# Altium PCB Transmitter_PCB_V4.0.PcbDoc (part 1 of 3)
Units mm, origin at the board's own origin, x right, y up, seen from the top; angles counter-clockwise.
Board outline 50 x 50 mm, 2 copper layers (Top Layer, Bottom Layer), stack 1.448 mm thick; 146 components, 102 nets, 432 pads, 97 vias.
Unrouted connection lines stored in the file: 102.
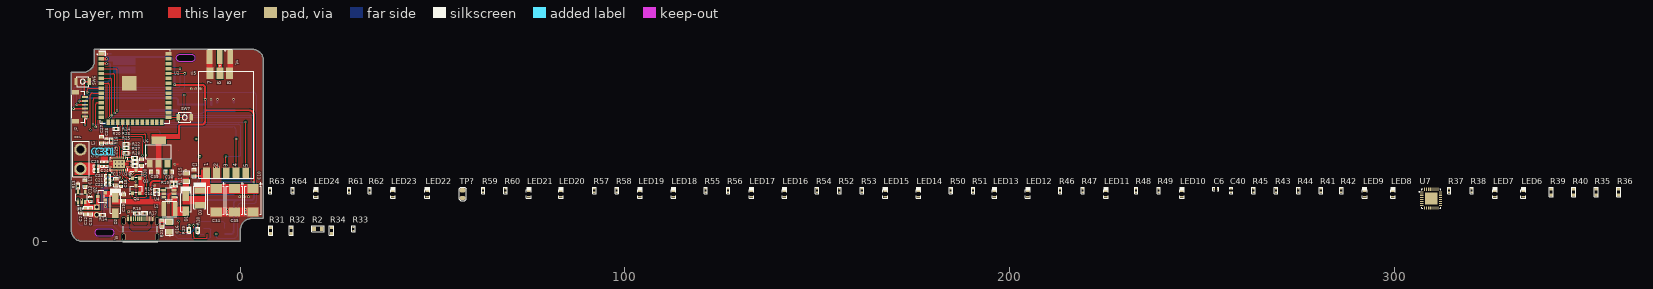
[diagram p0: Top Layer view]
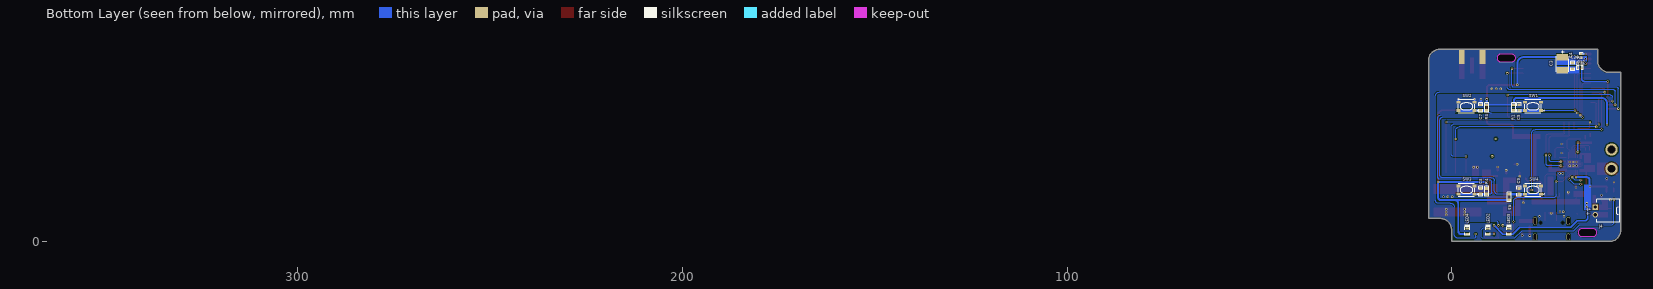
[diagram p1: Bottom Layer view, seen from below]

## Layer stack, top to bottom
Top Solder: solder mask 0.0762, Solder Resist, Dk 3.5
Top Layer: signal copper 0.254
Dielectric 1: dielectric 0.9398, FR-4, Dk 4.8
Bottom Layer: signal copper 0.254
Bottom Solder: solder mask 0.0762, Solder Resist, Dk 3.5

## Board outline
-44,3 -44,43.975 -41.008,43.975 -40.962,43.975 ccw(c-40.962,46.975) -37.962,46.975 -37.962,50 3,50 cw(c3,47) 6,47 6,6 3.046,6 3,6 ccw(c3,3) 0,3 0,0 -41,0 cw(c-41,3)
cut-out: -15.636,46.73 cw(c-15.636,47.73) -16.636,47.73 cw(c-15.636,47.73) -15.636,48.73 -12.81,48.73 cw(c-12.81,47.73) -11.81,47.73 cw(c-12.81,47.73) -12.81,46.73
cut-out: -36.746,1.308 cw(c-36.746,2.308) -37.746,2.308 cw(c-36.746,2.308) -36.746,3.308 -33.92,3.308 cw(c-33.92,2.308) -32.92,2.308 cw(c-33.92,2.308) -33.92,1.308

## Design rules (kind name [scope] priority, off if disabled: settings)
BoardOutlineClearance [All] p1: gap=0 ignorepadtopadclearanceinfootprint=FALSE except(0.254: Poly-OutlineEdge)
Clearance [All] p1: gap=0.178 ignorepadtopadclearanceinfootprint=FALSE except(0.127: SMDPad-Hole; 0.305: Arc-Poly Track-Poly SMDPad-Poly THPad-Poly Via-Poly Fill-Poly Poly-Poly)
ComponentClearance [All] p1: gap=0 collisioncheckmode=3 verticalgap=0 showdistances=FALSE
HoleSize [All] p1: absolutevalues=TRUE maxlimit=25.4 minlimit=0.025 maxpercent=80.000 minpercent=20.000
HoleToHoleClearance [All] p1: gap=0 allowstackedmicrovias=TRUE
MinimumSolderMaskSliver [All] p1: minsoldermaskwidth=0
PolygonConnect [All] p1: connectstyle=Direct reliefconductorwidth=0.254 reliefentries=4 polygonreliefangle="90 Angle" airgapwidth=0.254
RoutingVias [All] p1: holewidth=0.3 width=0.6 viastyle="Through Hole" minholewidth=0.3 minwidth=0.5 maxholewidth=0.3 maxwidth=0.6
SilkToSilkClearance [All] p1: silktosilkclearance=0
SilkToSolderMaskClearance [IsPad] p1: minsilkscreentomaskgap=0 clearancetoexposedcopper=TRUE
SolderMaskExpansion [All] p1: expansion=0.102 istentingtop=FALSE
SupplyNets "Schematic Supply Nets_12" [InNet('VCCP')] p1: voltage=0.000
SupplyNets "Schematic Supply Nets_11" [InNet('VLED')] p2: voltage=0.000
SupplyNets "Schematic Supply Nets_10" [InNet('3V3_WIFI')] p3: voltage=0.000
SupplyNets "Schematic Supply Nets_9" [InNet('EN1')] p4: voltage=0.000
SupplyNets "Schematic Supply Nets_8" [InNet('EN2')] p5: voltage=0.000
SupplyNets "Schematic Supply Nets_7" [InNet('GND')] p6: voltage=0.000
SupplyNets "Schematic Supply Nets_6" [InNet('VUSB')] p7: voltage=0.000
SupplyNets "Schematic Supply Nets_5" [InNet('VCC')] p8: voltage=0.000
SupplyNets "Schematic Supply Nets_4" [InNet('EN')] p9: voltage=0.000
SupplyNets "Schematic Supply Nets_3" [InNet('+5V')] p10: voltage=0.000
SupplyNets "Schematic Supply Nets_2" [InNet('VBAT')] p11: voltage=0.000
SupplyNets "Schematic Supply Nets_1" [InNet('POWER')] p12: voltage=0.000
SupplyNets "Schematic Supply Nets" [InNet('VCC#')] p13: voltage=0.000
Width [All] p1: maxlimit=1.27 minlimit=0.152 preferedwidth=0.254 minimp=50.000000 maximp=50.000000 favimp=50.000000
24 further rules are at their usual default settings.

## Classes and differential pairs
component class U_Power_Sheet: C11 C12 C13 C14 C15 C16 C17 C18 C19 C20 C21 C22 C23 C24 C25 C26 C27 C28 C29 C30 C31 C32 C38 C39 D1 D2 J3 L2 L3 LED2 LED5 Q2 Q3 Q4 R2 R10 R11 R13 R14 R15 R16 R17 R18 R19 R21 R22 R23 R24 R25 R27 R28 R29 R31 R32 R33 R34 U1 U3 U4 U6
component class U_Transmitter_Section: C1 C2 C3 C4 C5 C6 C7 C8 C9 C10 C33 C34 C35 C36 C37 C40 D3 J1 J2 J4 LED4 LED6 LED7 LED8 LED9 LED10 LED11 LED12 LED13 LED14 LED15 LED16 LED17 LED18 LED19 LED20 LED21 LED22 LED23 LED24 R1 R3 R4 R5 R8 R20 R35 R36 R37 R38 R39 R40 R41 R42 R43 R44 R45 R46 R47 R48 R49 R50 R51 R52 R53 R54 R55 R56 R57 R58 R59 R60 R61 R62 R63 R64 SW1 SW2 SW3 SW4 SW6 SW7 TP? U2 U5 U7

## Components (designator, comment, footprint, x,y, rotation, side; value= is the part's Value field where it differs from the comment)
C1 "0.1uF" Cap0603 -11.989,17.805 r90 top
C2 "0.47uF" Cap-0402 -41.575,7.976 r270 top
C3 "47uF" Case-B -28.829,46.228 r270 bottom
C4 "100nF" Cap-0402 -33.634,48.298 r270 bottom
C5 "0.1uF" Cap0603 -17.526,34.8 r90 bottom
C6 "100nF" Cap-0402 253.688,13.64 r0 top
C7 "0.1uF" Cap0603 -7.62,34.8 r90 bottom
C8 "0.1uF" Cap0603 -7.62,13.058 r90 bottom
C9 "0.1uF" Cap0603 -17.526,13.058 r90 bottom
C10 "330uF" CASE-D 3.293,10.705 r270 top
C11 "10uF" Cap-0603 -40.325,15.05 r270 top
C12 "10uF" Cap-0603 -40.177,7.874 r90 top
C13 "1nF" Cap-0402 -38.978,11.032 r270 top
C14 "1nF" Cap-0402 -21.797,12.381 r0 top
C15 "22uF" Cap-0805 -14.023,16.711 r270 top
C16 "4.7nF" Cap-1206 -18.415,3.81 r90 top
C17 "10uF" Cap-0603 -32.345,15.478 r90 top
C18 "100nF" Cap-0402 -31,14.912 r90 top
C19 "10uF" Cap-0603 -30.36,11.373 r270 top
C20 "10uF" Cap-0603 -25.704,20.491 r90 top
C21 "0.47uF" Cap-0402 -34.521,15.946 r0 top value=470nF
C22 "22nF" Cap-0402 -34.528,14.874 r0 top
C23 "10nF" Cap-0402 -34.521,17.014 r0 top
C24 "68nF" Cap-0402 -37.505,18.37 r0 top
C25 "68nF" Cap-0402 -37.505,19.496 r0 top
C26 "1nF" Cap-0402 -34.805,20.151 r270 top
C27 "10uF" Cap-0603 -36.042,26.44 r270 top
C28 "100nF" Cap-0402 -34.747,26.149 r270 top
C29 "10nF" Cap-0402 -33.774,23.293 r90 top
C30 "22nF" Cap-0402 -35.922,23.293 r90 top
C31 "0.47uF" Cap-0402 -34.834,23.293 r90 top value=470nF
C32 "1nF" Cap-0402 -35.922,20.151 r270 top
C33 "0.47uF" Cap-0603 -38.887,7.874 r90 top
C34 "330uF" CASE-D -6.292,10.702 r270 top
C35 "330uF" CASE-D -1.493,10.705 r270 top
C36 "22uF" Cap-0603 -31.496,45.593 r90 bottom
C37 "1uF" Cap-0402 -33.393,45.124 r180 bottom
C38 "22uF" Cap-0603 -18.521,18.109 r180 top
C39 "22uF" Cap-0603 -22.368,18.109 r0 top
C40 "100nF" Cap-0402 257.625,13.259 r90 top
D1 "SS32 /SMA(DO-214AC)" SMA -14.158,9.815 r270 top
D2 "SS16" SMA -32.487,9.373 r270 top
D3 "1N4007- SMD" SMA(DO-214AC) -10.541,11.328 r270 top
J1 "DNP" CON-SMA-EDGE_S -8.048,47.981 r270 top
J2 "Voltlink Target" "Voltlink Target" -41.656,35.052 r90 top
J3 "TYPE-C-31-M-12" TYPE-C-31-M-12_ -26.035,3.556 r0 top
J4 "PH-2AW" PH-2AW -37.383,7.947 r270 bottom
L2 "4.7uH" SPH4012H4R7MT -18.451,8.418 r0 top
L3 "13.3uH" "Th Hole Test Point (3.7mm Drill 6mm pad)" -41.6,23.907 r270 top
LED2 "RED" LED-0603 -9.5,2.675 r90 bottom
LED4 "Emerald" LED-0603 -4.064,2.675 r90 bottom
LED5 "RED" LED-0603 -14.935,2.675 r90 bottom
LED6 "Emerald" LED-0603 333.622,12.37 r90 top
LED7 "Emerald" LED-0603 326.256,12.37 r90 top
LED8 "Emerald" LED-0603 299.738,12.37 r90 top
LED9 "Emerald" LED-0603 292.372,12.37 r90 top
LED10 "Emerald" LED-0603 244.874,12.37 r90 top
LED11 "Emerald" LED-0603 225.062,12.37 r90 top
LED12 "Emerald" LED-0603 204.768,12.37 r90 top
LED13 "Emerald" LED-0603 196.132,12.37 r90 top
LED14 "Emerald" LED-0603 176.32,12.37 r90 top
LED15 "Emerald" LED-0603 167.684,12.37 r90 top
LED16 "Emerald" LED-0603 141.522,12.37 r90 top
LED17 "Emerald" LED-0603 132.886,12.37 r90 top
LED18 "Emerald" LED-0603 112.591,12.37 r90 top
LED19 "Emerald" LED-0603 103.955,12.37 r90 top
LED20 "Emerald" LED-0603 83.381,12.37 r90 top
LED21 "Emerald" LED-0603 74.999,12.37 r90 top
LED22 "Emerald" LED-0603 48.583,12.37 r90 top
LED23 "Emerald" LED-0603 39.693,12.37 r90 top
LED24 "Emerald" LED-0603 19.627,12.37 r90 top
Q2 "WPM2015-3/TR" Sot-23 -36.155,11.73 r90 top
Q3 "WPM2015-3/TR" Sot-23 -27.137,17.493 r0 top
Q4 "WPM2015-3/TR" Sot-23 -27.137,13.538 r0 top
R1 "4.7K" RES-0603 -16.171,34.8 r270 bottom
R2 "DNP" Res-0805 20.135,3.302 r0 top
R3 "4.7K" RES-0603 -9.144,34.8 r270 bottom
R4 "4.7K" RES-0603 -9.144,13.058 r270 bottom
R5 "4.7K" RES-0603 -15.008,11.521 r90 bottom
R8 "10K" Res-0402 -33.393,46.228 r0 bottom
R10 "680R" Res-0402 -11.049,2.921 r90 top
R11 "11K" Res-0402 -16.773,14.971 r90 top value=11kR
R13 "2.7K" Res-0402 -42.225,14.453 r270 top value=2.7kR
R14 "100K" Res-0402 -35.839,6.947 r0 top
R15 "5.1K" Res-0402 -26.912,7.366 r0 top
R16 "47K" Res-0402 -21.797,13.381 r0 top
R17 "5.1K" Res-0402 -24.935,7.366 r180 top
R18 "20K" Res-0402 -33.52,26.149 r90 top
R19 "1.5K" Res-0402 -17.783,14.971 r270 top
R20 "0R" Res-0402 -32.322,29.337 r0 top
R21 "1M" Res-0603 -20.32,4.699 r90 top
R22 "470R" Res-0402 -27.427,21.801 r0 top
R23 "80.6R" Res-0402 -29.662,24.325 r180 top
R24 "200R" Res-0402 -29.662,25.359 r180 top
R25 "10K" Res-0402 -29.662,23.006 r0 top
R27 "100K" Res-0402 -27.376,20.717 r0 top
R28 "100K" Res-0402 -27.376,19.644 r180 top
R29 "120R" Res-0402 -13.335,2.921 r270 top
R31 "0R" Res-0603 7.892,2.819 r90 top
R32 "DNP" Res-0603 13.201,2.819 r90 top
R33 "1K" Res-0402 29.406,3.251 r90 top
R34 "DNP" Res-0603 23.691,2.819 r90 top
R35 "DNP" Res-0603 352.596,12.827 r90 top
R36 "0R" Res-0603 358.438,12.827 r90 top
R37 "120R" Res-0402 314.369,13.259 r90 top
R38 "120R" Res-0402 320.211,13.259 r90 top
R39 "DNP" Res-0603 340.912,12.827 r90 top
R40 "0R" Res-0603 346.754,12.827 r90 top
R41 "120R" Res-0402 280.993,13.259 r90 top
R42 "120R" Res-0402 286.327,13.259 r90 top
R43 "10K" Res-0402 269.309,13.259 r90 top
R44 "0R" Res-0402 275.151,13.259 r90 top
R45 "0R" Res-0402 263.467,13.259 r90 top
R46 "120R" Res-0402 213.2,13.259 r90 top
R47 "120R" Res-0402 219.017,13.259 r90 top
R48 "10K" Res-0402 232.987,13.259 r90 top
R49 "0R" Res-0402 238.829,13.259 r90 top
R50 "120R" Res-0402 184.752,13.259 r90 top
R51 "120R" Res-0402 190.594,13.259 r90 top
R52 "120R" Res-0402 155.796,13.259 r90 top
R53 "120R" Res-0402 161.638,13.259 r90 top
R54 "0R" Res-0402 149.954,13.259 r90 top
R55 "120R" Res-0402 120.998,13.259 r90 top
R56 "120R" Res-0402 126.84,13.259 r90 top
R57 "120R" Res-0402 92.068,13.259 r90 top
R58 "120R" Res-0402 97.91,13.259 r90 top
R59 "120R" Res-0402 63.112,13.259 r90 top
R60 "120R" Res-0402 68.954,13.259 r90 top
R61 "120R" Res-0402 28.314,13.259 r90 top
R62 "120R" Res-0402 33.648,13.259 r90 top
R63 "120R" Res-0402 7.765,13.259 r90 top
R64 "120R" Res-0402 13.582,13.259 r90 top
SW1 "TSA016A2518A" TSA016A2518A -21.162,35.113 r0 bottom
SW2 "TSA016A2518A" TSA016A2518A -3.868,35.113 r0 bottom
SW3 "TSA016A2518A" TSA016A2518A -3.868,13.371 r0 bottom
SW4 "TSA016A2518A" TSA016A2518A -21.163,13.371 r0 bottom
SW6 "B3U-1000P" B3U-1000P -41.008,41.588 r180 top
SW7 "B3U-1000P" B3U-1000P -14.478,32.258 r0 top
TP? "2 Test Pad" "2 Test Pad" 57.778,11.303 r90 top
U1 "TP4054" SOT-23-5 -41.275,11.532 r90 top
U2 "ESP32-S3-WROOM-1U-N8R2" "41-SMD UFL Module" -27.432,39.878 r0 top
U3 "BQ51013BRHLR" "20-VQFN (3.5x4.5)" -31.595,20.151 r90 top
U4 "MT3608" SOT-23-6 -18.583,12.406 r180 top
U5 "HC-12 SMD" "HC-12 Module SMD" -2.762,30.607 r90 top
U6 "AMS1117-3.3" "SOT- 223" -21.267,23.292 r0 top
U7 "TCA6424ARGJR" "32-UQFN (5x5)" 309.67,11.151 r0 top

## Footprints (in the part's own frame and the unit in brackets; to place one, negate y for a bottom-side part, rotate by r counter-clockwise, add the part's x,y. Pads: shape width x height; smd on the part's side, far side on the other; paste and mask are expansions set on the pad)
"2 Test Pad" [mil]
  oct 45x60 smd: 1(0,0) 2(78.74,0)
  silkscreen extent -29,-36 108,36
"20-VQFN (3.5x4.5)" [mm]
  rect 0.24x0.6 smd: 1(-0.75,2.15) 10(-0.75,-2.15) 11(0.75,-2.15) 20(0.75,2.15)
  rect 0.6x0.24 smd: 2(-1.65,1.75) 3(-1.65,1.25) 4(-1.65,0.75) 5(-1.65,0.25) 6(-1.65,-0.25) 7(-1.65,-0.75) 8(-1.65,-1.25) 9(-1.65,-1.75) 12(1.65,-1.75) 13(1.65,-1.25) 14(1.65,-0.75) 15(1.65,-0.25) 16(1.65,0.25) 17(1.65,0.75) 18(1.65,1.25) 19(1.65,1.75)
  rrect5% 2.05x3.05 smd paste-3: 21(0,0)
  Top Layer region: 381 vertices and 0 holes, not listed, extent -1.025,-2.45 1.025,2.45
  silkscreen extent -2.26,-2.25 1.75,2.25, body extent -1.75,-2.25 1.75,2.25, height 1
"32-UQFN (5x5)" [mm]
  rect 0.86x0.27 smd: 1(-2.435,1.75) 2(-2.435,1.25) 3(-2.435,0.75) 4(-2.435,0.25) 5(-2.435,-0.25) 6(-2.435,-0.75) 7(-2.435,-1.25) 8(-2.435,-1.75) 17(2.435,-1.75) 18(2.435,-1.25) 19(2.435,-0.75) 20(2.435,-0.25) 21(2.435,0.25) 22(2.435,0.75) 23(2.435,1.25) 24(2.435,1.75)
  rect 0.27x0.86 smd: 9(-1.75,-2.435) 10(-1.25,-2.435) 11(-0.75,-2.435) 12(-0.25,-2.435) 13(0.25,-2.435) 14(0.75,-2.435) 15(1.25,-2.435) 16(1.75,-2.435) 25(1.75,2.435) 26(1.25,2.435) 27(0.75,2.435) 28(0.25,2.435) 29(-0.25,2.435) 30(-0.75,2.435) 31(-1.25,2.435) 32(-1.75,2.435)
  rect 3.15x3.15 smd paste-3: 33(0,0)
  silkscreen extent -3.17,-2.5 2.5,2.5, body extent -2.5,-2.5 2.5,2.5, height 0.6
"41-SMD UFL Module" [mm]
  rect 1.5x0.9 smd: 1(-8.75,8.88) 2(-8.75,7.61) 3(-8.75,6.34) 4(-8.75,5.07) 5(-8.75,3.8) 6(-8.75,2.53) 7(-8.75,1.26) 8(-8.75,-0.01) 9(-8.75,-1.28) 10(-8.75,-2.55) 11(-8.75,-3.82) 12(-8.75,-5.09) 13(-8.75,-6.36) 14(-8.75,-7.63) 27(8.75,-7.63) 28(8.75,-6.36) 29(8.75,-5.09) 30(8.75,-3.82) 31(8.75,-2.55) 32(8.75,-1.28) 33(8.75,-0.01) 34(8.75,1.26) 35(8.75,2.53) 36(8.75,3.8) 37(8.75,5.07) 38(8.75,6.34) 39(8.75,7.61) 40(8.75,8.88)
  rect 0.9x1.5 smd: 15(-6.98,-8.88) 16(-5.71,-8.88) 17(-4.44,-8.88) 18(-3.17,-8.88) 19(-1.9,-8.88) 20(-0.63,-8.88) 21(0.64,-8.88) 22(1.91,-8.88) 23(3.18,-8.88) 24(4.45,-8.88) 25(5.72,-8.88) 26(6.99,-8.88)
  rect 3.7x3.7 smd: 41(-1.5,1.26)
  silkscreen extent -9.8,-9.17 9.05,10.11, body extent -9,-9.12 9,10.08, height 3.35
B3U-1000P [mm] "SWITCH TACTILE SPST-NO 0.05A 12V"
  rect 0.82x1.72 smd: 1(-1.7,0) 2(1.7,0)
  silkscreen extent -1.57,-1.3 1.57,1.3, body extent -2,-1.26 2,1.24, height 1.6
Cap0603 [mil]
  rect 30x35 smd mask+2.36: 1(-30,0) 2(30,0)
  silkscreen extent -49,-21 49,21, body extent -32,-16 31,16, height 34
Cap-0402 [mil]
  rect 18x25 smd mask+2.36: 1(-18.5,0) 2(18.5,0)
  silkscreen extent -31,-16 31,16, body extent -20,-10 20,10, height 19
Cap-0603 [mil]
  rect 30x35 smd mask+2.36: 1(-30,0) 2(30,0)
  silkscreen extent -49,-21 49,21, body extent -32,-16 31,16, height 34
Cap-0805 [mil] "SMD 0805"
  rect 40x60 smd mask+2.76: 1(-40,0) 2(40,0)
  silkscreen extent -64,-34 64,34, body extent -39,-25 39,25, height 30
Cap-1206 [mil] "SMD 1206"
  rect 60x70 smd: 1(-50,0) 2(50,0)
  silkscreen extent -84,-39 84,39, body extent -63,-31 63,32, height 39
Case-B [mm]
  rect 1.7x3 smd paste+0: 1(-1.7,0) 2(1.7,0)
  silkscreen extent -3.35,-1.63 2.03,1.63, body extent -1.85,-1.5 1.85,1.5, height 2.16
CASE-D [mm]
  rect 2.4x2.9 smd: 1(-3.05,0) 2(3.05,0)
  silkscreen extent -4.7,-2.15 3.65,2.39, body extent -3.7,-2.22 3.7,2.22, height 3.01
CON-SMA-EDGE_S [mm]
  rect 3.7x1.5 smd: 1(0,2.7) 2(0,0) 3(0,5.4)
  rect 3.7x1.5 smd far side: 4(0,5.4) 5(0,0)
  silkscreen extent -1.96,-0.48 2.3,5.97, body extent -11.32,-0.42 2.01,5.93, height 3.55
"HC-12 Module SMD" [mm]
  rect 3x1.8 smd: 1(-12.873,6.006) 2(-12.873,3.466) 3(-12.873,0.926) 4(-12.873,-1.614) 5(-12.873,-4.154) 6(13.127,2.586) 7(13.127,5.126) 8(13.127,0.046)
  silkscreen extent -14.17,-6.27 13.63,8.13, body extent -13.98,-5.72 13.42,7.48, height 2.15
LED-0603 [mm]
  rect 0.5x1 smd: 1(-0.75,0) 2(0.75,0)
  silkscreen extent -1.12,-0.66 1.75,0.66, body extent -0.82,-0.37 0.82,0.36, height 0.68
PH-2AW [mm]
  rect 1.4x1.4 hole 0.85 paste-2539.97 mask+0.05: 1(-1,0)
  round 1.4 hole 0.85 paste-2539.97 mask+0.05: 2(1,0)
  silkscreen extent -3,0.4 3,6.4, body extent -3,-0.23 3,6.43, height 4.9
Res-0402 [mil]
  rect 18x25 smd mask+2.17: 1(-18.5,0) 2(18.5,0)
  silkscreen extent -32,-17 32,16, body extent -23,-11 23,11, height 16
RES-0603 [mil]
  rect 30x35 smd: 1(-30,0) 2(30,0)
  silkscreen extent -49,-21 49,21, body extent -31,-17 31,17, height 18
Res-0603 [mil]
  rect 30x35 smd: 1(-30,0) 2(30,0)
  silkscreen extent -48,-21 48,21, body extent -31,-17 31,17, height 18
Res-0805 [mil] "SMD 0805"
  rect 40x50 smd: 1(-40,0) 2(40,0)
  silkscreen extent -64,-29 64,29, body extent -39,-25 39,24, height 24
SMA [mm]
  rect 2.5x1.7 smd: 1(-2,0) 2(2,0)
  silkscreen extent -4.44,-1.42 2.06,1.42, body extent -2.6,-1.3 2.6,1.3, height 2.4
SMA(DO-214AC) [mm]
  rect 1.6x2.8 smd: 1(-1.9,0) 2(1.9,0)
  silkscreen extent -3.99,-1.6 2.84,1.6, body extent -2.6,-1.45 2.6,1.45, height 2.3
Sot-23 [mm] "TRANS NPN 40V 0.6A SOT23"
  rect 0.82x0.92 smd: 1(-0.95,-1) 2(0.95,-1) 3(0,1)
  silkscreen extent -1.68,-1.3 1.55,0.81, body extent -1.5,-1.25 1.5,1.25, height 1.05
SOT-23-5 [mm]
  rect 1.1x0.6 smd: 1(-1.3,0.95) 2(-1.3,0) 3(-1.3,-0.95) 4(1.3,-0.95) 5(1.3,0.95)
  silkscreen extent -2.13,-1.5 0.88,1.5, body extent -1.4,-1.45 1.4,1.45, height 1.45
SOT-23-6 [mm]
  rect 1.22x0.62 smd: 1(-1.31,0.95) 2(-1.31,0) 3(-1.31,-0.95) 4(1.31,-0.95) 5(1.31,0) 6(1.31,0.95)
  silkscreen extent -2.18,-1.52 0.86,1.52, body extent -1.5,-1.5 1.5,1.5, height 1.47
"SOT- 223" [mm]
  rect 1.5x2 smd: 1(-2.3,-3.05) 2(0,-3.05) 3(2.3,-3.05)
  rect 3.8x2 smd: 4(0,3.05)
  silkscreen extent -3.35,-3.2 3.3,1.8, body extent -3.25,-3.5 3.25,3.5, height 1.61
SPH4012H4R7MT [mm]
  rect 1.1x3.7 smd: 1(-1.5,0) 2(1.5,0)
  silkscreen extent -1.88,-2.03 1.88,2.03, body extent -2,-2 2,2, height 2
"Th Hole Test Point (3.7mm Drill 6mm pad)" [mm]
  round 3.2 hole 2: 1(0,0) 2(5,0)
TSA016A2518A [mm]
  rect 1.05x0.7 smd paste+0 mask+0.051: 1(-2.1,1.075) 2(2.1,1.075) 3(-2.1,-1.075) 4(2.1,-1.075)
  silkscreen extent -2.9,-1.69 2.2,1.71, body extent -2.25,-1.7 2.25,1.7, height 2.5
TYPE-C-31-M-12_ [mm]
  rect 0.6x1.2 smd: A1/B12(-3.2,2.375) A4/B9(-2.4,2.375) B1/A12(3.2,2.375) B4/A9(2.4,2.375)
  rect 0.3x1.2 smd: A5(-1.25,2.375) A6(-0.25,2.375) A7(0.25,2.375) A8(1.25,2.375) B5(1.75,2.375) B6(0.75,2.375) B7(-0.75,2.375) B8(-1.75,2.375)
  round 0 hole 0.62 unplated: MH(-2.89,1.305) MH(2.89,1.305)
  oval 0.9x2 hole 0.6 slot 1.7 at 90 deg: S1(4.325,1.805) S4(-4.325,1.805)
  oval 0.9x1.7 hole 0.6 slot 1.4 at 90 deg: S2(4.325,-2.375) S3(-4.325,-2.375)
  silkscreen extent -4.5,-3.57 4.5,0.44, body extent -4.47,-5.01 4.47,2.89, height 3.31
"Voltlink Target" [mm]
  rect 0.5x1.6 smd: 1(-2.5,-1.262) 2(-1.5,-1.262) 3(-0.5,-1.262) 4(0.5,-1.262) 5(1.5,-1.262) 6(2.5,-1.262)
  rect 1.2x1.8 smd: MP1(-3.8,1.262) MP2(3.8,1.262)
  silkscreen extent -4.06,-1.68 4.06,2.17, body extent -4,-1.49 4,2.11, height 4.25

## Part data
C1 C5 C7 C8 C9: library part CC0603ZRY5V9BB104, "CAP CER 0.1UF 50V Y5V 0603", Capacitance=100nF, Case Code (Imperial)=0603, Case Code (Metric)=1608, Dielectric=Y5V, Manufacturer=Yageo, Max Operating Temperature=85°C, Min Operating Temperature=-30°C, Package Quantity=1, Supplier Part Number 1=311-1343-1-ND, Tolerance=80%, Voltage=50V, Case/Package=0603, ComponentLink1Description=http://www.yageo.com/documents/recent/UPY-GPHC_Y5V_6.3V-to-50V_8.pdf?src-supplier=Digi-Key, ComponentLink1URL=http://www.yageo.com/documents/recent/UPY-GPHC_Y5V_6.3V-to-50V_8.pdf?src-supplier=Digi-Key, ComponentLink2Description=http://www.yageo.com/documents/recent/UPY-GPHC_Y5V_6.3V-to-50V_5.pdf?src-supplier=Avnet+Europe, ComponentLink2URL=http://www.yageo.com/documents/recent/UPY-GPHC_Y5V_6.3V-to-50V_5.pdf?src-supplier=Avnet+Europe, ComponentLink3Description=https://www.verical.com/server-webapp/html/getDatasheet?partID=403611&src-supplier=Verical, ComponentLink3URL=https://www.verical.com/server-webapp/html/getDatasheet?partID=403611&src-supplier=Verical, ComponentLink4Description=http://www.mouser.com/ds/2/447/Yageo_UPY-GP_NP0_16V-to-50V_9-358835.pdf?src-supplier=Mouser, ComponentLink4URL=http://www.mouser.com/ds/2/447/Yageo_UPY-GP_NP0_16V-to-50V_9-358835.pdf?src-supplier=Mouser, ComponentLink5Description=http://www.farnell.com/datasheets/1132289.pdf?src-supplier=Element14, ComponentLink5URL=http://www.farnell.com/datasheets/1132289.pdf?src-supplier=Element14, Composition=Ceramic, Depth=0.8mm, Halogen Free="Halogen Free", Height=0.8mm, Lead Free="Lead Free", Length=1.6mm, Manufacturer Part Number=CC0603ZRY5V9BB104, Mount="Surface Mount", Number of Pins=2, Packaging="Tape and Reel", Pricing 1="1=0.1, 10=0.075, 100=0.0334, 500=0.02386, 1000=0.01874 (USD)", Radiation Hardening=No, REACH SVHC="No SVHC", Stock 1=15000880, Supplier 1=Digi-Key, Termination=SMD/SMT, Thickness=0.035inch, Voltage Rating=50V, Voltage Rating (DC)=50V, Width=0.031inch
C2: library part CC0402KRX5R7BB474, "CAP CER 0.47UF 16V X5R 0402", Capacitance=470nF, Case/Package=0402, LCSC Part Number=C527010, Manufacturer=Yageo, Max Operating Temperature=85°C, Min Operating Temperature=-55°C, Supplier Part Number 1=1070400, Tolerance=10%, Voltage Rating=16V, Category="Ceramic Capacitors", ComponentLink1Description=http://www.yageo.com/documents/recent/UPY-GPHC_X5R_4V-to-50V_25.pdf?src-supplier=Digi-Key, ComponentLink1URL=http://www.yageo.com/documents/recent/UPY-GPHC_X5R_4V-to-50V_25.pdf?src-supplier=Digi-Key, ComponentLink2Description=http://www.yageo.com/exep/pages/download/literatures/ProductSelectionGuide%202014_Final_2.pdf?src-supplier=Digi-Key, ComponentLink2URL=http://www.yageo.com/exep/pages/download/literatures/ProductSelectionGuide%202014_Final_2.pdf?src-supplier=Digi-Key, Halogen Free="Halogen Free", Item Type=Capacitor, Lead Free="Lead Free", Length=0.039inch, Manufacturer Part Number=CC0402KRX5R7BB474, Mount="Surface Mount", Packaging="Tape and Reel", Pricing 1="10000=0.01840, 20000=0.01800, 40000=0.01760, 50000=0.01750, 150000=0.01670 (USD)", RoHS=Yes, RoHS Compliant=Yes, Stock 1=10000, Supplier 1="Future Electronics", Thickness=0.022inch, Voltage Rating (DC)=16V, Width=0.02inch
C3: library part TPSB476K010R0250, "CAP TANT 47UF 10% 10V 1411", LCSC Part Number=C308881, Manufacturer="Kyocera AVX", Ripple Current=583mA, ComponentLink1Description=https://datasheet.ciiva.com/16328/tps-16328667.pdf?src-supplier=Future+Electronics, ComponentLink1URL=https://datasheet.ciiva.com/16328/tps-16328667.pdf?src-supplier=Future+Electronics, ComponentLink2Description=https://datasheet.ciiva.com/7713/1680477-7713437.pdf?src-supplier=Element14, ComponentLink2URL=https://datasheet.ciiva.com/7713/1680477-7713437.pdf?src-supplier=Element14, ComponentLink3Description=https://datasheet.ciiva.com/14590/70001047-14590282.pdf?src-supplier=Allied+Electronics, ComponentLink3URL=https://datasheet.ciiva.com/14590/70001047-14590282.pdf?src-supplier=Allied+Electronics, ComponentLink4Description=https://datasheet.ciiva.com/14593/70001047-14593294.pdf?src-supplier=Allied+Electronics, ComponentLink4URL=https://datasheet.ciiva.com/14593/70001047-14593294.pdf?src-supplier=Allied+Electronics, ComponentLink5Description=https://datasheet.ciiva.com/3004/tps-3004609.pdf?src-supplier=Avnet, ComponentLink5URL=https://datasheet.ciiva.com/3004/tps-3004609.pdf?src-supplier=Avnet, ComponentLink6Description=https://datasheet.ciiva.com/264/tps-264094.pdf?src-supplier=Digikey, ComponentLink6URL=https://datasheet.ciiva.com/264/tps-264094.pdf?src-supplier=Digikey, ComponentLink7Description=https://datasheet.ciiva.com/264/tps-264095.pdf?src-supplier=Digikey, ComponentLink7URL=https://datasheet.ciiva.com/264/tps-264095.pdf?src-supplier=Digikey, ComponentLink8Description=https://datasheet.ciiva.com/264/tps-264096.pdf?src-supplier=Digikey, ComponentLink8URL=https://datasheet.ciiva.com/264/tps-264096.pdf?src-supplier=Digikey, Item Type="Tantalum Capacitors", Lead Free=5697LeadFree, Life (Hours)=2000Hour, Manufacturer Part Number=TPSB476K010R0250, Pricing="1=0.78, 10=0.488, 50=0.3748, 100=0.3397, 500=0.28054, 1000=0.26226 (USD)", RoHS=Yes, RoHS Compliant=5897YesNo, Stock=118032, Supplier=Digikey
C4 C6 C18 C28 C40: library part CC0402KRX5R8BB104, "CAP CER 0.1UF 25V X5R 0402", Case Code (Imperial)=0402, Case Code (Metric)=1005, Dielectric=X5R, LCSC Part Number=C106256, Manufacturer=Yageo, Max Operating Temperature=85°C, Min Operating Temperature=-55°C, Resistor Type=Ceramic, Supplier Part Number 1=311-1697-1-ND, Tolerance=10%, Voltage Rating=25V, Capacitance=100nF, Case/Package=0402, Category="Ceramic Capacitors", ComponentLink1Description=http://www.mouser.com/ds/2/447/UPY-GPHC_X5R_4V-to-50V_25-1131599.pdf?src-supplier=Mouser, ComponentLink1URL=http://www.mouser.com/ds/2/447/UPY-GPHC_X5R_4V-to-50V_25-1131599.pdf?src-supplier=Mouser, ComponentLink2Description=http://www.yageo.com/documents/recent/UPY-GPHC_X5R_4V-to-50V-16.pdf?src-supplier=Future+Electronics, ComponentLink2URL=http://www.yageo.com/documents/recent/UPY-GPHC_X5R_4V-to-50V-16.pdf?src-supplier=Future+Electronics, ComponentLink3Description=http://www.yageo.com/documents/recent/UPY-GPHC_X5R_4V-to-50V_25.pdf?src-supplier=Digi-Key, ComponentLink3URL=http://www.yageo.com/documents/recent/UPY-GPHC_X5R_4V-to-50V_25.pdf?src-supplier=Digi-Key, Depth=0.5mm, Halogen Free="Halogen Free", Item Type=Capacitor, Lead Free="Lead Free", Length=0.039inch, Manufacturer Part Number=CC0402KRX5R8BB104, Mount="Surface Mount", Packaging="Tape and Reel", Pricing 1="1=0.10000, 10=0.03800, 50=0.02100, 100=0.01710, 500=0.01224, 1000=0.00961, 2500=0.00874, 5000=0.00804 (USD)", RoHS=Yes, RoHS Compliant=Yes, Series=CC, Stock 1=4598218, Supplier 1=Digi-Key, Thickness=0.022inch, Voltage Rating (DC)=25V, Width=0.02inch
C10 C34 C35: library part TAJD337K010RNJ, "CAP TANT 330UF 10% 10V 2917", Dielectric Material=5684ConductorMaterial, LCSC Part Number=C7226, Manufacturer="Kyocera AVX", Ripple Current=408mA, Voltage Rating (AC)=10V, ComponentLink1Description=https://datasheet.ciiva.com/11794/0900766b802e69d0-11794408.pdf?src-supplier=Rs, ComponentLink1URL=https://datasheet.ciiva.com/11794/0900766b802e69d0-11794408.pdf?src-supplier=Rs, ComponentLink2Description=https://datasheet.ciiva.com/19467/1236841-19467295.pdf?src-supplier=Jameco, ComponentLink2URL=https://datasheet.ciiva.com/19467/1236841-19467295.pdf?src-supplier=Jameco, ComponentLink3Description=https://datasheet.ciiva.com/26944/getdatasheetpartid-149137-26944845.pdf?src-supplier=Verical, ComponentLink3URL=https://datasheet.ciiva.com/26944/getdatasheetpartid-149137-26944845.pdf?src-supplier=Verical, ComponentLink4Description=https://datasheet.ciiva.com/3004/taj-3004541.pdf?src-supplier=Avnet, ComponentLink4URL=https://datasheet.ciiva.com/3004/taj-3004541.pdf?src-supplier=Avnet, ComponentLink5Description=https://datasheet.ciiva.com/3004/taj-3004542.pdf?src-supplier=Avnet, ComponentLink5URL=https://datasheet.ciiva.com/3004/taj-3004542.pdf?src-supplier=Avnet, ComponentLink6Description=https://datasheet.ciiva.com/265/taj-265298.pdf?src-supplier=Digikey, ComponentLink6URL=https://datasheet.ciiva.com/265/taj-265298.pdf?src-supplier=Digikey, ComponentLink7Description=https://datasheet.ciiva.com/265/taj-265299.pdf?src-supplier=Digikey, ComponentLink7URL=https://datasheet.ciiva.com/265/taj-265299.pdf?src-supplier=Digikey, ComponentLink8Description=https://datasheet.ciiva.com/265/taj-265300.pdf?src-supplier=Digikey, ComponentLink8URL=https://datasheet.ciiva.com/265/taj-265300.pdf?src-supplier=Digikey, ComponentLink9Description=https://datasheet.ciiva.com/7832/1680476-7832489.pdf?src-supplier=Element14, ComponentLink9URL=https://datasheet.ciiva.com/7832/1680476-7832489.pdf?src-supplier=Element14, ComponentLink10Description=https://datasheet.ciiva.com/7832/1680476-7832490.pdf?src-supplier=Element14, ComponentLink10URL=https://datasheet.ciiva.com/7832/1680476-7832490.pdf?src-supplier=Element14, ComponentLink11Description=https://datasheet.ciiva.com/7832/1680476-7832491.pdf?src-supplier=Element14, ComponentLink11URL=https://datasheet.ciiva.com/7832/1680476-7832491.pdf?src-supplier=Element14, Item Type=Capacitor, Lead Free=5697LeadFree, Life (Hours)=1000Hour, Manufacturer Part Number=TAJD337K010RNJ, Pricing="500=0.37263 (USD)", RoHS=Yes, Stock=24500, Supplier=Avnet
C11 C12 C17 C19 C20 C27: library part CL10A106MA8NRNC, "CAP CER 10UF 25V X5R 0603", Case Code (Imperial)=0603, Case Code (Metric)=1608, Dielectric=X5R, LCSC Part Number=C96446, Manufacturer=Samsung, Max Operating Temperature=85°C, Min Operating Temperature=-55°C, Package Quantity=1, Tolerance=20%, Voltage Rating=25V, Capacitance=10uF, Case/Package=0603, Category="Ceramic Capacitors", ComponentLink1Description=https://datasheet.ciiva.com/25766/cl10a106ma8nrnc-25766562.pdf?src-supplier=Digi-Key, ComponentLink1URL=https://datasheet.ciiva.com/25766/cl10a106ma8nrnc-25766562.pdf?src-supplier=Digi-Key, Construction=Flat, Contact Plating=Tin, Lead Free="Lead Free", Length=0.063inch, Manufacturer Part Number=CL10A106MA8NRNC, Mount="Surface Mount", Packaging="Tape and Reel", Pricing 1="4000=0.03753, 8000=0.03700, 16000=0.03595, 24000=0.03515, 32000=0.03383, 40000=0.03304, 400000=0.03225 (USD)", RoHS=Yes, RoHS Compliant=Yes, Series=CL, Supplier 1=Avnet, Supplier Part Number 1=CL10A106MA8NRNC, Termination=Wraparound, Thickness=0.035inch, Width=0.031inch
C13 C14: library part CC0402KRX7R8BB102, "CAP CER 1000PF 25V X7R 0402", Case Code (Imperial)=0402, Case Code (Metric)=1005, Dielectric=X7R, Insulation Resistance=10GR, LCSC Part Number=C541372, Manufacturer=Yageo, Max Operating Temperature=125°C, Min Operating Temperature=-55°C, Tolerance=10%, Voltage Rating=25V, Capacitance=1nF, Case/Package=0402, Category="Ceramic Capacitors", ComponentLink1Description=https://datasheet.ciiva.com/26862/getdatasheetpartid-639817-26862638.pdf?src-supplier=Verical, ComponentLink1URL=https://datasheet.ciiva.com/26862/getdatasheetpartid-639817-26862638.pdf?src-supplier=Verical, ComponentLink2Description=https://datasheet.ciiva.com/5425/upy-gp-np0-16v-to-50v-8-3714-5425527.pdf?src-supplier=Mouser, ComponentLink2URL=https://datasheet.ciiva.com/5425/upy-gp-np0-16v-to-50v-8-3714-5425527.pdf?src-supplier=Mouser, Depth=0.5mm, Dissipation Factor=2.5%, Halogen Free="Halogen Free", Item Type=Capacitor, Lead Free="Lead Free", Length=1mm, Manufacturer Part Number=CC0402KRX7R8BB102, Mount="Surface Mount", Number of Pins=2, Packaging="Tape and Reel", Pricing 1="1=0.00230, 10000=0.00230, 100001=0.00190 (USD)", Radiation Hardening=No, RoHS=Yes, RoHS Compliant=Yes, Series=CC, Stock 1=370000, Supplier 1="Arrow Electronics", Supplier Part Number 1=CC0402KRX7R8BB102, Termination=SMD/SMT, Thickness=0.022inch, Voltage Rating (DC)=25V, Width=0.02inch
C15: library part CC0805MKX5R8BB226, "CAP CER 22UF 25V X5R 0805", Case Code (Imperial)=0805, Case Code (Metric)=2012, Dielectric=X5R, LCSC Part Number=C784585, Manufacturer=Yageo, Max Operating Temperature=85°C, Min Operating Temperature=-55°C, Package Quantity=3000, Supplier Part Number 1=311-1903-1-ND, Tolerance=20%, Voltage Rating=25V, Capacitance=22uF, Case/Package=0805, Category="Ceramic Capacitors", ComponentLink1Description=http://www.mouser.com/ds/2/447/Yageo_UPY-GP_NP0_16V-to-50V_9-358835.pdf?src-supplier=Mouser, ComponentLink1URL=http://www.mouser.com/ds/2/447/Yageo_UPY-GP_NP0_16V-to-50V_9-358835.pdf?src-supplier=Mouser, ComponentLink2Description=http://www.yageo.com/documents/recent/UPY-GPHC_X5R_4V-to-50V_25.pdf?src-supplier=Digi-Key, ComponentLink2URL=http://www.yageo.com/documents/recent/UPY-GPHC_X5R_4V-to-50V_25.pdf?src-supplier=Digi-Key, Halogen Free="Halogen Free", Height=1.25mm, Item Type=Capacitor, Lead Free="Lead Free", Length=0.079inch, Manufacturer Part Number=CC0805MKX5R8BB226, Mount="Surface Mount", Packaging="Tape and Reel", Pricing 1="1=0.47000, 10=0.33300, 50=0.25140, 100=0.21900, 500=0.16222, 1000=0.13789 (USD)", RoHS=Yes, RoHS Compliant=Yes, Stock 1=64970, Supplier 1=Digi-Key, Termination=SMD/SMT, Thickness=0.057inch, Voltage Rating (DC)=25V, Weight=0.000194oz, Width=0.049inch
C16: library part CC1206KKX7RCBB472, "CAP CER 4700PF 1KV X7R 1206", Case Code (Imperial)=1206, Case Code (Metric)=3216, Dielectric=X7R, Dielectric Material=Ceramic, LCSC Part Number=C107198, Manufacturer=Yageo, Max Operating Temperature=125°C, Min Operating Temperature=-55°C, Supplier Part Number 1=7130131, Tolerance=10%, Voltage Rating=1kV, Capacitance=4.7nF, Case/Package=1206, Category="Ceramic Capacitors", ComponentLink1Description=https://datasheet.ciiva.com/13208/upy-gp-np0-16v-to-50v-8-13208693.pdf?src-supplier=Mouser, ComponentLink1URL=https://datasheet.ciiva.com/13208/upy-gp-np0-16v-to-50v-8-13208693.pdf?src-supplier=Mouser, ComponentLink2Description=https://datasheet.ciiva.com/11466/hv-11466701.pdf?src-supplier=Avnet, ComponentLink2URL=https://datasheet.ciiva.com/11466/hv-11466701.pdf?src-supplier=Avnet, Depth=1.6mm, Item Type=Capacitor, Lead Free="Lead Free", Length=3.2mm, Manufacturer Part Number=CC1206KKX7RCBB472, Mount="Surface Mount", Number of Pins=2, Packaging="Tape and Reel", Pricing 1="3000=0.02860, 9000=0.02750, 15000=0.02700, 45000=0.02600, 75000=0.02510 (USD)", Radiation Hardening=No, Resistor Type=Ceramic, RoHS=Yes, RoHS Compliant=Yes, Series=CC, Stock 1=180000, Supplier 1="Future Electronics", Termination=SMD/SMT, Thickness=0.057inch, Voltage Rating (DC)=1kV, Weight=0.000571oz, Width=0.063inch
C21 C31: library part CL05A474KA5NNNC, "CAP CER 0.47UF 25V X5R 0402", Case Code (Imperial)=0402, Case Code (Metric)=1005, Manufacturer=Samsung, Max Operating Temperature=85°C, Min Operating Temperature=-55°C, Tolerance=10%, Voltage Rating=25V, Case/Package=0402, Category="Ceramic Capacitors", ComponentLink1Description=https://datasheet.ciiva.com/25796/cl05a474ka5nnnc-25796037.pdf?src-supplier=Digikey, ComponentLink1URL=https://datasheet.ciiva.com/25796/cl05a474ka5nnnc-25796037.pdf?src-supplier=Digikey, ComponentLink2Description=https://datasheet.ciiva.com/29198/458859-da-01-en-vs-kondensator-0402-29198303.pdf?src-supplier=Conrad, ComponentLink2URL=https://datasheet.ciiva.com/29198/458859-da-01-en-vs-kondensator-0402-29198303.pdf?src-supplier=Conrad, Height=550um, Lead Free="Lead Free", Manufacturer Part Number=CL05A474KA5NNNC, Material=Ceramic, Mounting Technology="Surface Mount", Packaging="Cut Tape", Pricing="100000=0.02563 (USD)", RoHS=Yes, RoHS Compliant=Yes, Series=CL, Stock=80000, Supplier=Avnet, Supplier Part Number=CL05A474KA5NNNC, Voltage Rating (DC)=25V
C22 C30: library part GRM155B31H223KA12D, "50V 22nF B ±10% 0402 Multilayer Ceramic Capacitors MLCC - SMD/SMT ROHS", LCSC Part Number=C521247, Manufacturer="Murata Electronics", Package=0402, ComponentLink1Description=LCSC, ComponentLink1URL=https://www.lcsc.com/product-detail/Multilayer-Ceramic-Capacitors-MLCC-SMD-SMT_Murata-Electronics-GRM155B31H223KA12D_C521247.html, Item Type=Capacitor, Manufacturer Part Number=GRM155B31H223KA12D
C23 C29: library part CC0402KRX7R9BB103, "CAP CER 10000PF 50V X7R 0402", Case Code (Imperial)=0402, Case Code (Metric)=1005, Dielectric=X7R, LCSC Part Number=C60133, Manufacturer=Yageo, Max Operating Temperature=125°C, Min Operating Temperature=-55°C, Package Quantity=1, Resistor Type=Ceramic, Tolerance=10%, Voltage=50V, Capacitance=10nF, Case/Package=0402, Category="Ceramic Capacitors", ComponentLink1Description=https://datasheet.ciiva.com/11788/0900766b8079c870-11788375.pdf?src-supplier=RSComponents, ComponentLink1URL=https://datasheet.ciiva.com/11788/0900766b8079c870-11788375.pdf?src-supplier=RSComponents, ComponentLink2Description=https://datasheet.ciiva.com/26862/getdatasheetpartid-138248-26862642.pdf?src-supplier=Verical, ComponentLink2URL=https://datasheet.ciiva.com/26862/getdatasheetpartid-138248-26862642.pdf?src-supplier=Verical, ComponentLink3Description=https://datasheet.ciiva.com/7978/1489800-7978093.pdf?src-supplier=Element14, ComponentLink3URL=https://datasheet.ciiva.com/7978/1489800-7978093.pdf?src-supplier=Element14, ComponentLink4Description=https://datasheet.ciiva.com/28450/1489800-28450377.pdf?src-supplier=Element14, ComponentLink4URL=https://datasheet.ciiva.com/28450/1489800-28450377.pdf?src-supplier=Element14, ComponentLink5Description=https://datasheet.ciiva.com/176/mlccorderingcode-176349.pdf?src-supplier=Digi-Key, ComponentLink5URL=https://datasheet.ciiva.com/176/mlccorderingcode-176349.pdf?src-supplier=Digi-Key, ComponentLink6Description=https://datasheet.ciiva.com/176/mlccorderingcode-176348.pdf?src-supplier=Digi-Key, ComponentLink6URL=https://datasheet.ciiva.com/176/mlccorderingcode-176348.pdf?src-supplier=Digi-Key, ComponentLink7Description=https://datasheet.ciiva.com/176/mlccorderingcode-176350.pdf?src-supplier=Digi-Key, ComponentLink7URL=https://datasheet.ciiva.com/176/mlccorderingcode-176350.pdf?src-supplier=Digi-Key, Depth=0.5mm, Halogen Free="Halogen Free", Height=0.5mm, Item Type=Capacitor, Lead Free="Lead Free", Length=1mm, Manufacturer Part Number=CC0402KRX7R9BB103, Mount="Surface Mount", Packaging="Tape and Reel", Pricing 1="10000=0.00178 (USD)", Radiation Hardening=No, Reach SVHC Compliant=Yes, RoHS=Yes, RoHS Compliant=Yes, Series=CC, Stock 1=995000, Supplier 1=Avnet, Supplier Part Number 1=CC0402KRX7R9BB103, Termination=SMD/SMT, Thickness=0.022inch, Voltage Rating=50V, Voltage Rating (DC)=50V, Width=0.02inch
C24 C25: library part CC0402KRX7R9BB683, "CAP CER 0.068UF 50V X7R 0402", Case/Package=343Case, Dielectric=1511DielectricType, Manufacturer=Yageo, Supplier Part Number 1=2106471, Voltage Rating (DC)=50V, Capacitance=68nF, Category="Ceramic Capacitors", Halogen Free=5694HalogenFree, Item Type=Capacitor, Lead Free=5697LeadFree, Manufacturer Part Number=CC0402KRX7R9BB683, Pricing 1="10000=0.0035, 40000=0.0033, 100000=0.0032, 250000=0.0031, 400000=0.0029 (USD)", RoHS=Yes, Stock 1=100000, Supplier 1="Future Electronics"
C26 C32: library part C1005C0G1E102JT000F, "CAP CER 1000PF 25V C0G 0402", LCSC Part Number=C343059, Manufacturer=TDK, Package=0402, ComponentLink1Description=LCSC, ComponentLink1URL=https://www.lcsc.com/product-detail/Multilayer-Ceramic-Capacitors-MLCC-SMD-SMT_TDK-C1005C0G1E102JT000F_C343059.html, Item Type=Capacitor, Manufacturer Part Number=C1005C0G1E102JT000F
C33: library part CC0603KRX5R9BB474, "CAP CER 0.47UF 50V X5R 0603", Capacitance=470nF, Case/Package=0603, Dielectric=X5R, LCSC Part Number=C513651, Manufacturer=Yageo, Max Operating Temperature=85°C, Min Operating Temperature=-55°C, Supplier Part Number 1=311-4047-1-ND, Tolerance=10%, Voltage Rating=50V, Category="Ceramic Capacitors", ComponentLink1Description="https://www.mouser.com/ds/2/447/ProductSelectionGuide 2014_Final_2-1131690.pdf?src-supplier=Mouser", ComponentLink1URL="https://www.mouser.com/ds/2/447/ProductSelectionGuide 2014_Final_2-1131690.pdf?src-supplier=Mouser", ComponentLink2Description=http://www.yageo.com/documents/recent/UPY-GPHC_X5R_4V-to-50V_25.pdf?src-supplier=Digi-Key, ComponentLink2URL=http://www.yageo.com/documents/recent/UPY-GPHC_X5R_4V-to-50V_25.pdf?src-supplier=Digi-Key, ComponentLink3Description=http://www.yageo.com/exep/pages/download/literatures/ProductSelectionGuide%202014_Final_2.pdf?src-supplier=Digi-Key, ComponentLink3URL=http://www.yageo.com/exep/pages/download/literatures/ProductSelectionGuide%202014_Final_2.pdf?src-supplier=Digi-Key, Halogen Free="Halogen Free", Item Type=Capacitor, Lead Free="Lead Free", Length=0.063inch, Manufacturer Part Number=CC0603KRX5R9BB474, Mount="Surface Mount", Packaging="Tape and Reel", Pricing 1="1=0.45000, 10=0.31400, 50=0.22000, 100=0.18860, 500=0.14144, 1000=0.11944 (USD)", RoHS=Yes, RoHS Compliant=Yes, Stock 1=15145, Supplier 1=Digi-Key, Thickness=0.035inch, Voltage Rating (DC)=50V, Width=0.031inch
C36 C38 C39: library part CC0603MRX5R6BB226, "CAP CER 22UF 10V X5R 0603", Case Code (Imperial)=0603, Case Code (Metric)=1608, Dielectric=X5R, LCSC Part Number=C109447, Manufacturer=Yageo, Max Operating Temperature=85°C, Min Operating Temperature=-55°C, Package Quantity=4000, Supplier Part Number 1=311-1819-1-ND, Tolerance=20%, Voltage Rating=10V, Capacitance=22uF, Case/Package=0603, Category="Ceramic Capacitors", ComponentLink1Description=http://www.mouser.com/ds/2/447/Yageo_UPY-GP_NP0_16V-to-50V_9-358835.pdf?src-supplier=Mouser, ComponentLink1URL=http://www.mouser.com/ds/2/447/Yageo_UPY-GP_NP0_16V-to-50V_9-358835.pdf?src-supplier=Mouser, ComponentLink2Description=http://www.yageo.com/documents/recent/UPY-GPHC_X5R_4V-to-50V_25.pdf?src-supplier=Digi-Key, ComponentLink2URL=http://www.yageo.com/documents/recent/UPY-GPHC_X5R_4V-to-50V_25.pdf?src-supplier=Digi-Key, Halogen Free="Halogen Free", Height=0.8mm, Item Type=Capacitor, Lead Free="Lead Free", Length=0.063inch, Manufacturer Part Number=CC0603MRX5R6BB226, Mount="Surface Mount", Packaging="Tape and Reel", Pricing 1="1=0.68000, 10=0.48000, 50=0.36300, 100=0.31610, 500=0.23416, 1000=0.19903 (USD)", RoHS=Yes, RoHS Compliant=Yes, Stock 1=19628, Supplier 1=Digi-Key, Termination=SMD/SMT, Thickness=0.035inch, Voltage Rating (DC)=10V, Weight=7.1E-05oz, Width=0.8mm
C37: library part GRM155C71C105KE11D, "CAP CER 1UF 16V X7S 0402", Case/Package=343Case, Dielectric=1542DielectricType, LCSC Part Number=C576449, Manufacturer=Murata, Max Operating Temperature=125°C, Min Operating Temperature=-55°C, Tolerance=10%, Voltage Rating=16V, Height=600um, Item Type=Capacitors, Length=1mm, Manufacturer Part Number=GRM155C71C105KE11D, Material=4241ConductorMaterial, Pricing="1=0.11, 10=0.041, 50=0.041, 100=0.026, 1000=0.023, 10000=0.016 (USD)", RoHS=No, Stock=16102, Supplier=Mouser, Thickness=500um, Voltage Rating (DC)=16V, Width=500um
D1: "20V 500mV@3A 3A SMA(DO-214AC) Schottky Barrier Diodes (SBD) ROHS", LCSC Part Number=C34897, Manufacturer=MDD, Manufacturer Part Number=SS32, Package=SMA(DO-214AC), ComponentLink1Description=LCSC, ComponentLink1URL=https://www.lcsc.com/product-detail/Schottky-Barrier-Diodes-SBD_MDD-Microdiode-Electronics-SS32_C34897.html, Item Type=Diode
D2: "60V 700mV@1A 1A SMA(DO-214AC) Schottky Barrier Diodes (SBD) ROHS", LCSC Part Number=C2481, Manufacturer=MDD, Package=SMA(DO-214AC), ComponentLink1Description=LCSC, ComponentLink1URL=https://www.lcsc.com/product-detail/Schottky-Barrier-Diodes-SBD_MDD-Microdiode-Electronics-SS16_C2481.html, Item Type="Schottky Diode", Manufacturer Part Number=SS16
D3: "1A Single 1kV 1.1V@1A SMA(DO-214AC) Diodes - General Purpose ROHS", LCSC Part Number=C727081, Manufacturer=TWGMC, Manufacturer Part Number=1N4007, Package=SMA(DO-214AC), ComponentLink1Description=LCSC, ComponentLink1URL=https://www.lcsc.com/product-detail/Diodes-General-Purpose_TWGMC-1N4007_C727081.html, Item Type=Diode
J1: library part CON-SMA-EDGE-S, "Sma Female Connector, Pcb Edge Mount Rohs Compliant: Yes", Case/Package=SMA, Manufacturer="RF Solutions", Package=THT, Supplier Part Number 1=1258191, Category="RF / Coaxial Connectors", ComponentLink1Description=https://media.digikey.com/pdf/Data%20Sheets/RF%20Solutions%20PDFs/CON-SMA-EDGE.pdf?src-supplier=Digi-Key, ComponentLink1URL=https://media.digikey.com/pdf/Data%20Sheets/RF%20Solutions%20PDFs/CON-SMA-EDGE.pdf?src-supplier=Digi-Key, Connector Type=SMA, Fastening Type=Threaded, Item Type=Connector, Manufacturer Part Number=CON-SMA-EDGE-S, Mount=Edge,Board, Number of Ports=1, Pricing 1="1=1.16, 10=0.96 (GBP)", RoHS=Yes, Series=-, Stock 1=4145, Supplier 1=Rs, Termination=Solder
J2: library part C145963, "1x6P SH 1 1mm 6 SMD,P=1mm Wire To Board / Wire To Wire Connector ROHS", Manufacturer=BOOMELE, Package=SMD,P=1mm, ComponentLink1Description=LCSC, ComponentLink1URL=https://www.lcsc.com/product-detail/Wire-To-Board-Wire-To-Wire-Connector_BOOMELE-Boom-Precision-Elec-C145963_C145963.html, Item Type=Connector, LCSC Part Number=C145963, Manufacturer Part Number=C145963
J3: "5A 1 16P Female Type-C SMD USB Connectors ROHS", LCSC Part Number=C165948, Manufacturer="Korean Hroparts Elec", ComponentLink1Description=LCSC, ComponentLink1URL=https://www.lcsc.com/product-detail/USB-Connectors_Korean-Hroparts-Elec-TYPE-C-31-M-12_C165948.html, Item Type="USB Connector", Manufacturer Part Number=TYPE-C-31-M-12
J4: "1x2P 2P PH 1 Tin 2mm 2 -25℃~+85℃ Brass 2A Bend insert Push-Pull,P=2mm Wire To Board Connector ROHS", LCSC Part Number=C2908634, Manufacturer=HCTL, Package=Push-Pull,P=2mm, ComponentLink1Description=LCSC, ComponentLink1URL=https://www.lcsc.com/product-detail/Wire-To-Board-Connector_HCTL-PH-2AW_C2908634.html, Item Type="Wire To Board Connector", Manufacturer Part Number=PH-2AW
L2: library part SPH4012H4R7MT, "1.2A 4.7uH ±20% 108mΩ SMD Power Inductors ROHS", LCSC Part Number=C98396, Manufacturer=Sunlord, Supplier Part Number 1=3442-SPH4012H4R7MTTR-ND, ComponentLink1Description=LCSC, ComponentLink1URL=https://www.lcsc.com/product-detail/Power-Inductors_Sunlord-SPH4012H4R7MT_C98396.html, Item Type=Inductor, Manufacturer Part Number=SPH4012H4R7MT, Pricing 1="4500=0.21008 (USD)", RoHS=No, Supplier 1=Digi-Key
L3: library part WR483265-15F5-G, "1 Coil, 1 Layer 13.3µH Wireless Charging Coil Receiver 200mOhm", Digikey Part Number=445-16090-ND, Manufacturer="TDK Corporation", Package=-, ComponentLink1Description=Digikey, ComponentLink1URL=https://www.digikey.com/en/products/detail/tdk-corporation/WR483265-15F5-G/4702656?s=N4IgTCBcDaIOoCUAsAOAzGAbAVgLQEZsAxPAcRAF0BfIA, Item Type="Wireless Charging Coil", Manufacturer Part Number=WR483265-15F5-G
LED2 LED5: library part NCD0603R3, "RED LED 0603 Light Emitting Diodes", LCSC Part Number=C3151730, Manufacturer="Foshan NationStar Optoelectronics", Package=0603, ComponentLink1Description=LCSC, ComponentLink1URL=https://www.lcsc.com/product-detail/Light-Emitting-Diodes-LED_Foshan-NationStar-Optoelectronics-NCD0603R3_C3151730.html, Item Type=LED, Manufacturer Part Number=NCD0603R3
LED4 LED6 LED7 LED8 LED9 LED10 LED11 LED12 LED13 LED14 LED15 LED16 LED17 LED18 LED19 LED20 LED21 LED22 LED23 LED24: library part NCD0603G2, "Emerald 0603 Light Emitting Diodes (LED) ROHS", LCSC Part Number=C87326, Manufacturer="Foshan NationStar Optoelectronics", Package=0603, ComponentLink1Description=LCSC, ComponentLink1URL=https://www.lcsc.com/product-detail/Light-Emitting-Diodes-LED_Foshan-NationStar-Optoelectronics-NCD0603G2_C87326.html, Item Type=LED, Manufacturer Part Number=NCD0603G2
Q2 Q3 Q4: "20V 2.2A 800mW 110mΩ@4.5V,2.7A 810mV@250uA P Channel SOT-23 MOSFETs ROHS", LCSC Part Number=C213159, Manufacturer=WILLSEMI, Package=SOT-23, ComponentLink1Description=LCSC, ComponentLink1URL=https://www.lcsc.com/product-detail/MOSFETs_WILLSEMI-Will-Semicon-WPM2015-3-TR_C213159.html, Item Type=Mosfet, Manufacturer Part Number=WPM2015-3/TR
R1 R3 R4 R5: library part RC0603FR-074K7L, "RES SMD 4.7K OHM 1% 1/10W 0603", Case Code (Imperial)=0603, Case Code (Metric)=1608, Manufacturer=Yageo, Max Operating Temperature=155°C, Max Power Dissipation=100mW, Min Operating Temperature=-55°C, Resistance=4.7kR, Resistance Tolerance=1%, Resistor Type="Thick Film", Supplier Part Number 1=311-4.70KHRCT-ND, Temperature Coefficient=100ppm/°C, Voltage Rating=50V, Case/Package=0603, Category="Chip SMD Resistors", ComponentLink1Description=https://datasheet.ciiva.com/15189/getdatasheetpartid-422754-15189760.pdf?src-supplier=Verical, ComponentLink1URL=https://datasheet.ciiva.com/15189/getdatasheetpartid-422754-15189760.pdf?src-supplier=Verical, ComponentLink2Description=https://datasheet.ciiva.com/22747/443971-22747528.pdf?src-supplier=Element14, ComponentLink2URL=https://datasheet.ciiva.com/22747/443971-22747528.pdf?src-supplier=Element14, ComponentLink3Description=https://datasheet.ciiva.com/7660/38590-7660794.pdf?src-supplier=Element14, ComponentLink3URL=https://datasheet.ciiva.com/7660/38590-7660794.pdf?src-supplier=Element14, ComponentLink4Description=https://datasheet.ciiva.com/7746/1868787-7746365.pdf?src-supplier=Element14, ComponentLink4URL=https://datasheet.ciiva.com/7746/1868787-7746365.pdf?src-supplier=Element14, ComponentLink5Description=https://datasheet.ciiva.com/46440/1868787-46440909.pdf?src-supplier=Element14, ComponentLink5URL=https://datasheet.ciiva.com/46440/1868787-46440909.pdf?src-supplier=Element14, ComponentLink6Description=https://datasheet.ciiva.com/7746/1738695-7746366.pdf?src-supplier=Element14, ComponentLink6URL=https://datasheet.ciiva.com/7746/1738695-7746366.pdf?src-supplier=Element14, Construction=Rectangular, Depth=0.8mm, Features="Moisture Resistant", Height=0.45mm, Lead Free="Lead Free", Lead Pitch=0.3mm, Length=1.6mm, Manufacturer Part Number=RC0603FR-074K7L, Military Standard=Not, Number of Pins=2, Number of Terminations=2, Packaging="Tape and Reel", Power Rating=100mW, Pricing 1="1=0.10000, 10=0.02400, 100=0.00970, 1000=0.00436, 2500=0.00378 (USD)", REACH SVHC="No SVHC", RoHS=Yes, RoHS Compliant=Yes, Series=RC, Size Code=0603, Stock 1=1924316, Supplier 1=Digi-Key, Termination=SMD/SMT, Tolerance=1%, Voltage Rating (DC)=50V, Width=0.8mm
R2: library part RC0805FR-070RL, "RES 0 OHM JUMPER 1/8W 0805", Case Code (Imperial)=0805, Case Code (Metric)=2012, LCSC Part Number=C100045, Manufacturer=Yageo, Max Operating Temperature=155°C, Max Power Dissipation=125mW, Min Operating Temperature=-55°C, Resistance=0mR, Resistor Type="Thick Film", Tolerance=1%, Case/Package=0805, Category="Chip SMD Resistors", ComponentLink1Description=https://datasheet.ciiva.com/15189/getdatasheetpartid-348154-15189885.pdf?src-supplier=Verical, ComponentLink1URL=https://datasheet.ciiva.com/15189/getdatasheetpartid-348154-15189885.pdf?src-supplier=Verical, ComponentLink2Description=https://datasheet.ciiva.com/17042/rc0805-17042698.pdf?src-supplier=Future+Electronics, ComponentLink2URL=https://datasheet.ciiva.com/17042/rc0805-17042698.pdf?src-supplier=Future+Electronics, Construction=Rectangular, Contact Plating=Tin,Matte, Depth=1.25mm, Features="Moisture Resistant", Item Type=Resistor, Lead Free="Lead Free", Length=2mm, Manufacturer Part Number=RC0805FR-070RL, Military Standard=Not, Number of Terminations=2, Packaging="Tape and Reel", Power Rating=125mW, Pricing 1="5000=0.00281, 10000=0.00277, 20000=0.00269 (USD)", Radiation Hardening=No, RoHS=Yes, RoHS Compliant=Yes, Series=RC, Size Code=0805, Stock 1=85000, Supplier 1=Avnet, Supplier Part Number 1=RC0805FR-070RL